# Altium PCB Diff_Pair.PcbDoc
Units mm, origin at the board's own origin, x right, y up, seen from the top; angles counter-clockwise.
Board outline 159.87 x 71.85 mm, 4 copper layers (Top Layer, GND 1, PWR, Bottom Layer), stack 1.625 mm thick; 14 components, 4 nets, 115 pads, 93 vias.
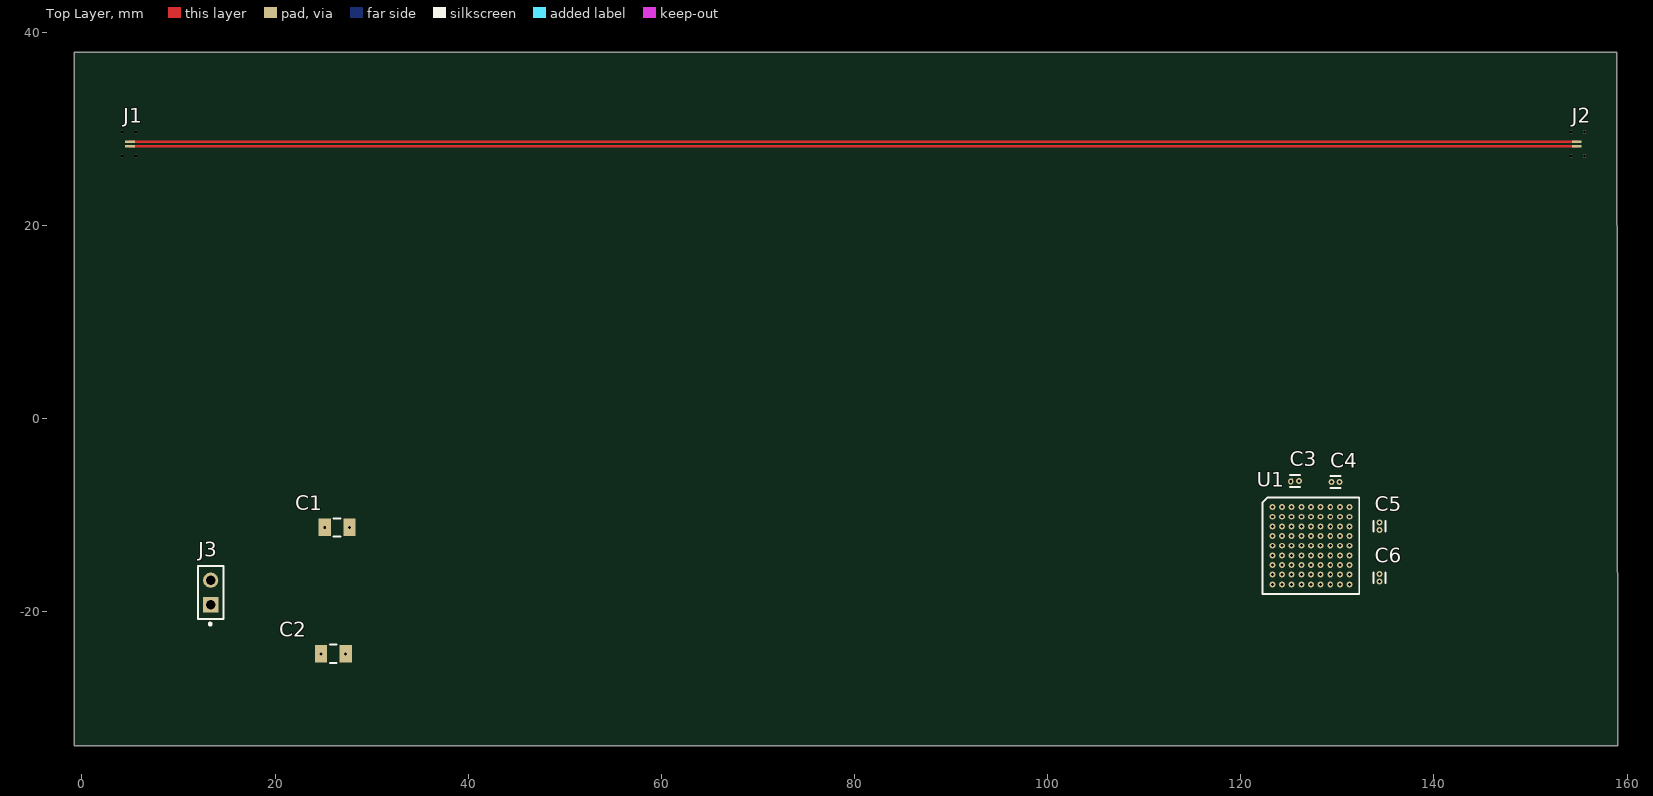
[diagram p0: Top Layer view]
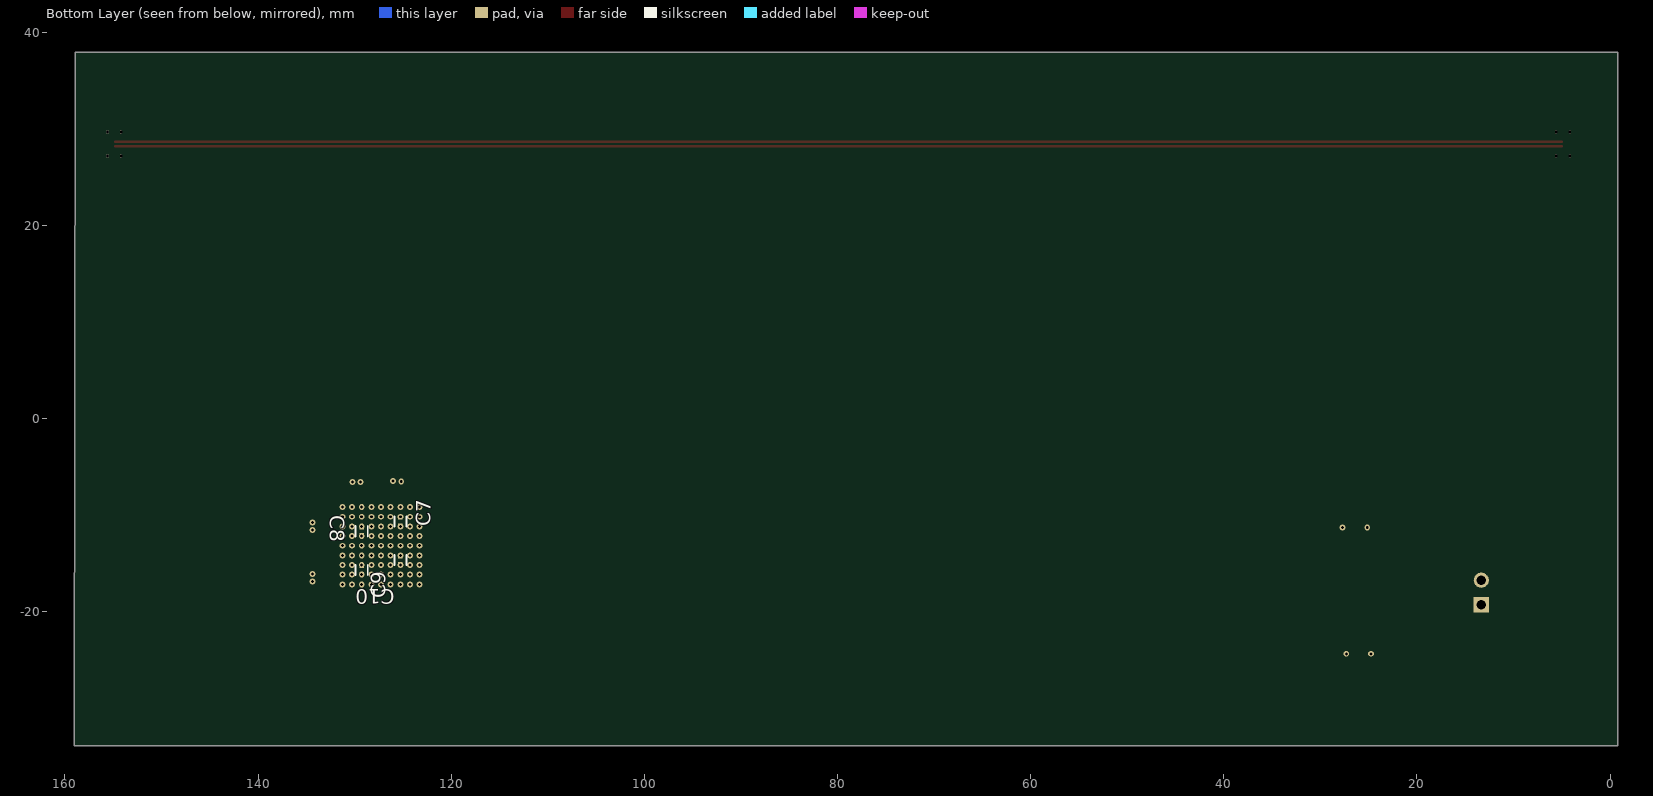
[diagram p1: Bottom Layer view, seen from below]
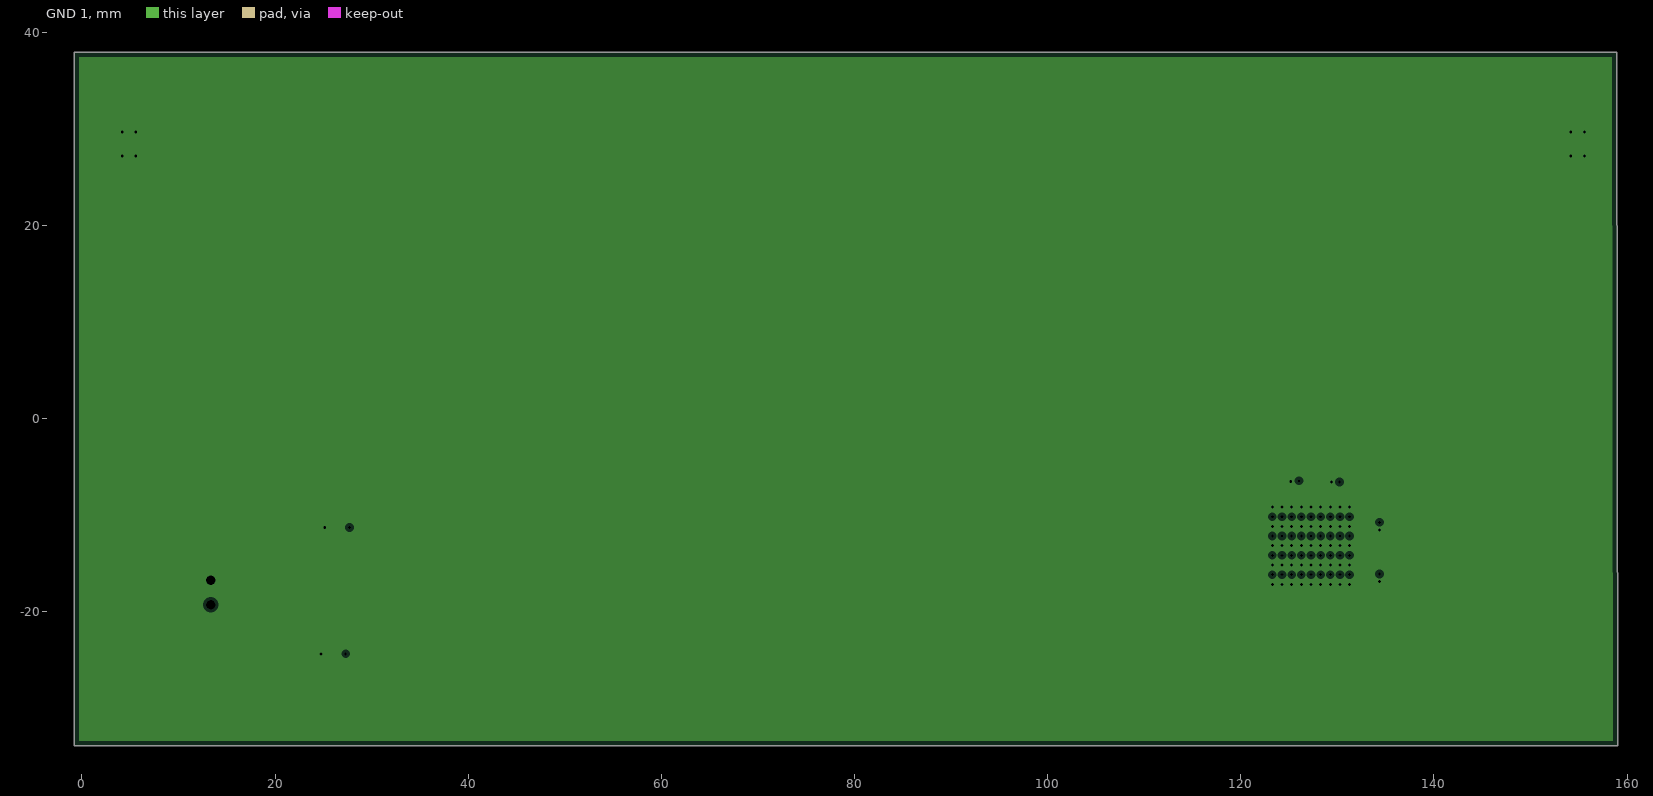
[diagram p2: GND 1, clearances drawn from the general rule]
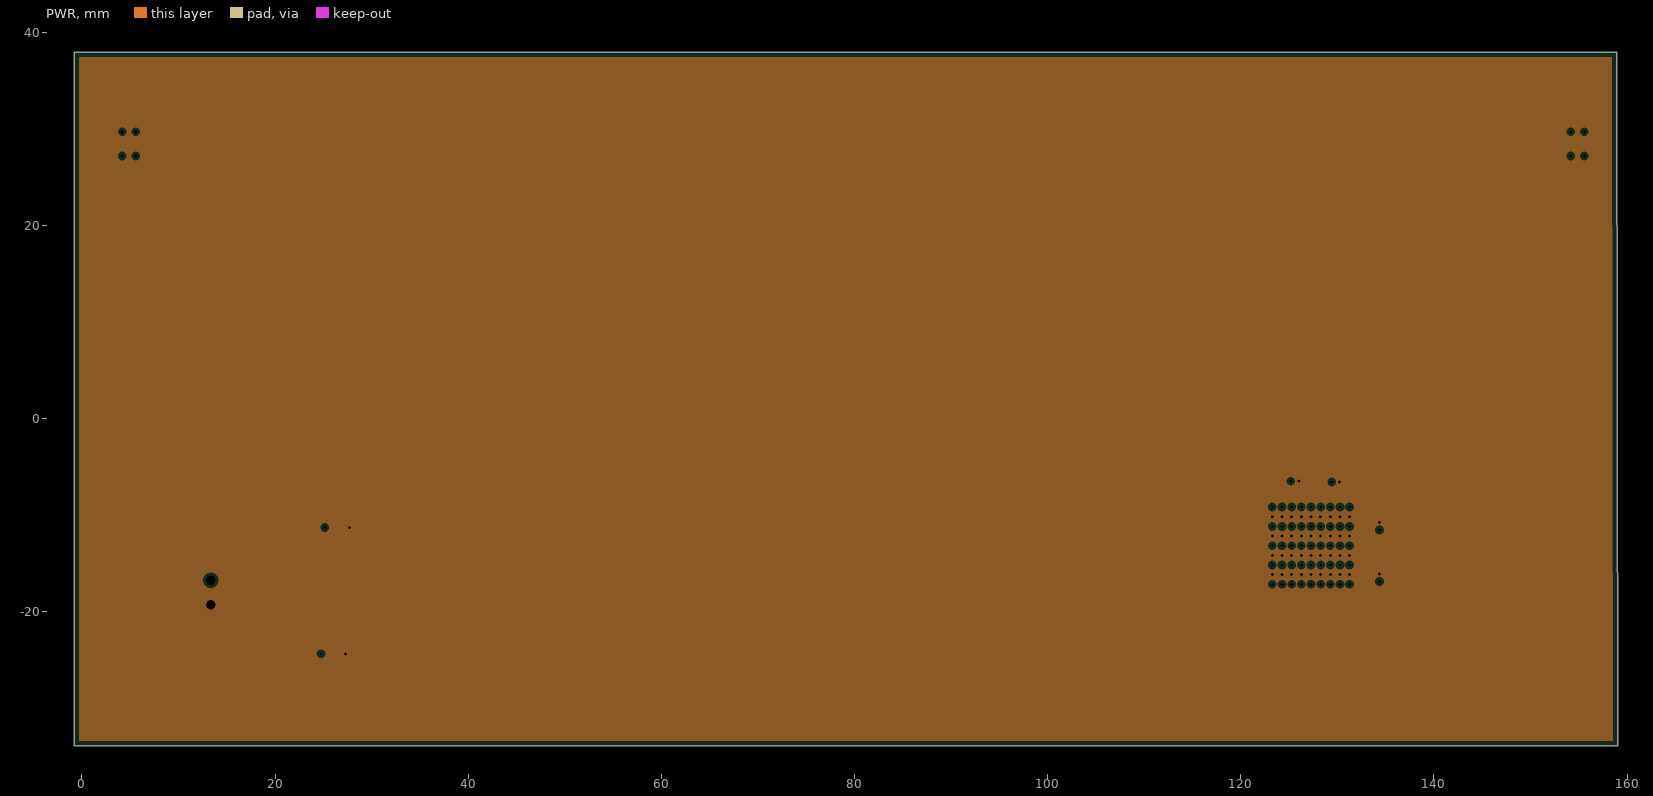
[diagram p3: PWR, clearances drawn from the general rule]
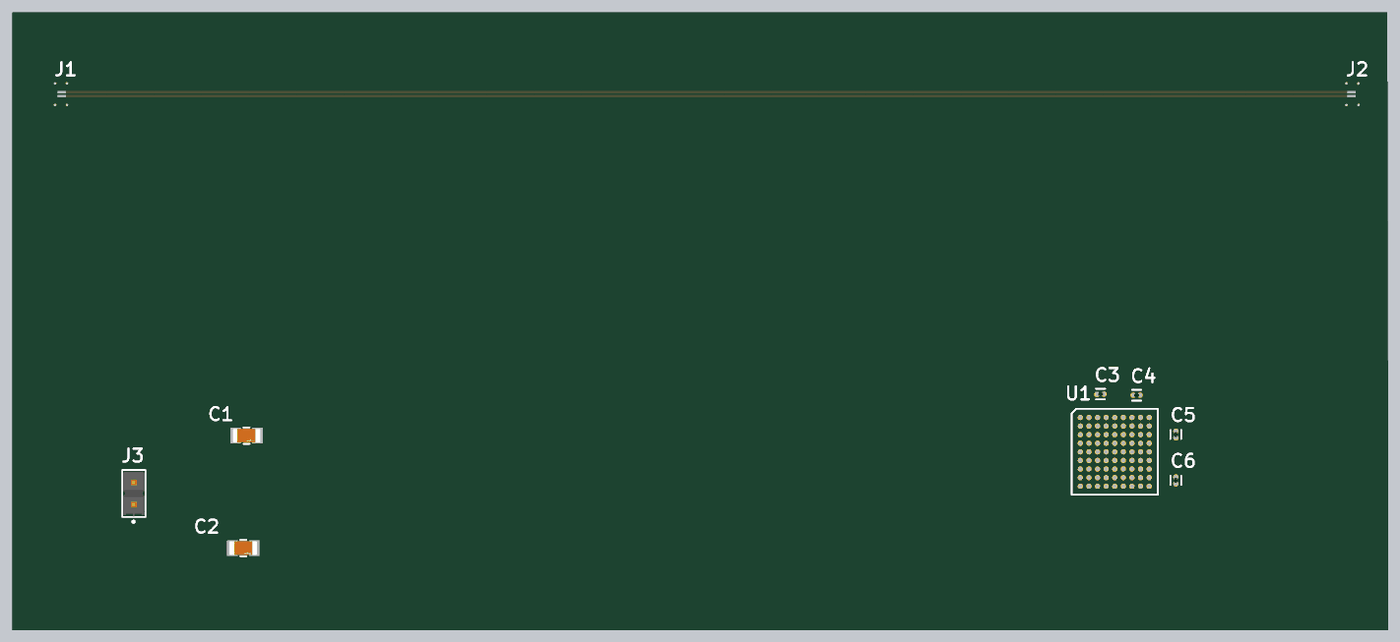
[diagram p4: 3D render of the assembled board from above, using the file's embedded part models]
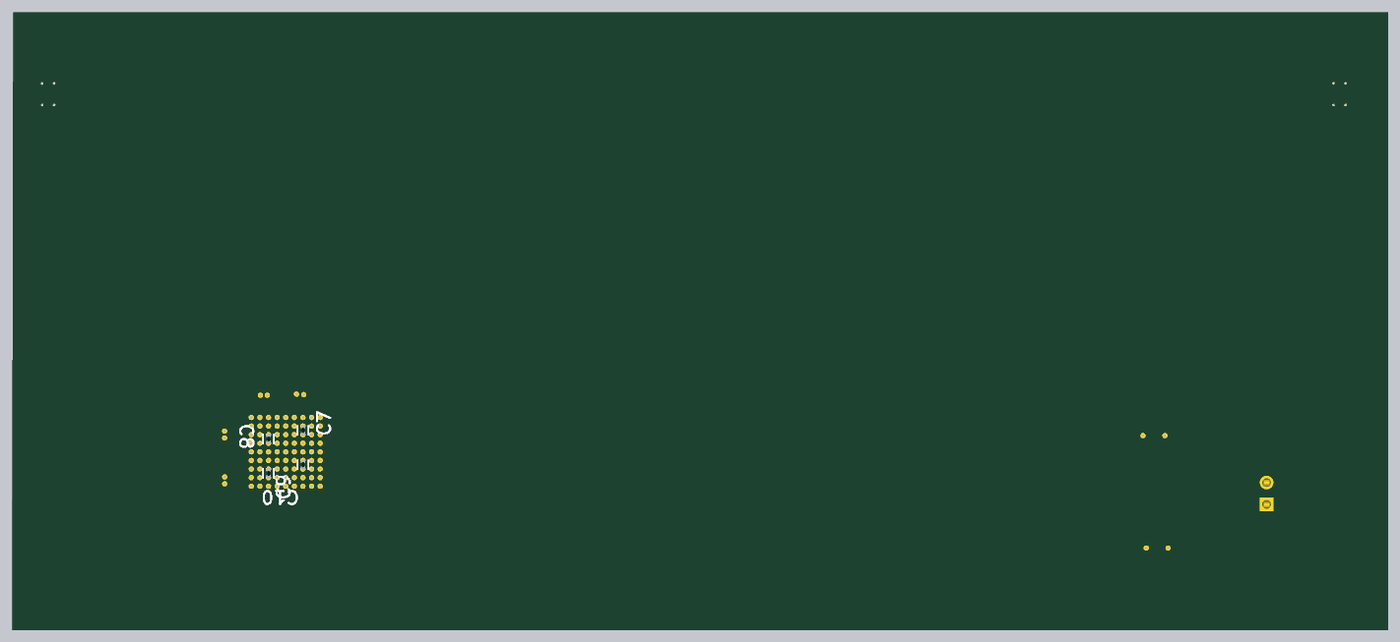
[diagram p5: 3D render of the assembled board from below, using the file's embedded part models]

## Layer stack, top to bottom
Top Solder: solder mask 0.0102, Solder Resist, Dk 3.5
Top Layer: signal copper 0.035
Dielectric 2: prepreg 0.21, PP-006, Dk 4.4
GND 1: plane copper 0.035, net GND
Dielectric 1: core 1.065, FR-4, Dk 4.6
PWR: plane copper 0.035, net VDD
Dielectric 3: prepreg 0.21, PP-006, Dk 4.4
Bottom Layer: signal copper 0.035
Bottom Solder: solder mask 0.0102, Solder Resist, Dk 3.5

## Board outline
-0.814,-33.925 -0.814,37.925 158.929,37.925 159.055,-33.925

## Design rules (kind name [scope] priority, off if disabled: settings)
Clearance [All] p1: gap=0.15 ignorepadtopadclearanceinfootprint=FALSE
DiffPairsRouting [InDifferentialPairClass('All Differential Pairs')] p1: maxlimit=0.22 minlimit=0.19 mostfreqgap=0.203 toplayer_minwidth=0.23 toplayer_maxwidth=0.26 toplayer_prefwidth=0.246 bottomlayer_maxgap=0.203 bottomlayer_minwidth=0.23 bottomlayer_maxwidth=0.26 bottomlayer_prefwidth=0.246 maxuncoupledlength=3
MinimumSolderMaskSliver [All] p1: minsoldermaskwidth=0.1
ParallelSegment [All] p1: limit=254 gap=0.254
PlaneClearance [All] p1: clearance=0.3
PlaneConnect [All] p1: planeconnectstyle=Direct reliefexpansion=0.508 reliefentries=4 reliefconductorwidth=0.254 reliefairgap=0.254
PolygonConnect [All] p1: connectstyle=Relief reliefconductorwidth=0.254 reliefentries=4 polygonreliefangle="90 Angle" airgapwidth=0.254
RoutingVias [InDifferentialPairClass('All Differential Pairs')] p1: holewidth=0.2 width=0.4 viastyle="Through Hole" minholewidth=0.2 minwidth=0.4 maxholewidth=0.2 maxwidth=0.4
SilkToSilkClearance [All] p1: silktosilkclearance=0.15
SilkToSolderMaskClearance [IsPad] p1: minsilkscreentomaskgap=0.15 clearancetoexposedcopper=TRUE
SolderMaskExpansion [All] p1: expansion=0 istentingtop=FALSE
SupplyNets "Schematic Supply Nets_1" [InNet('VDD')] p1: voltage=0.000
SupplyNets "Schematic Supply Nets" [InNet('GND')] p2: voltage=0.000
Width [All] p1: maxlimit=0.5 minlimit=0.15 preferedwidth=0.246
24 further rules are at their usual default settings.

## Classes and differential pairs
differential pair C: +C_P -C_N

## Components (designator, comment, footprint, x,y, rotation, side; value= is the part's Value field where it differs from the comment)
C1 "GRM31CD80G107MEA8K" FP-GRM31C-0_3-e0_3_0_8-IPC_C 26.421,-11.303 r0 top
C2 "GRM31CD80G107MEA8K" FP-GRM31C-0_3-e0_3_0_8-IPC_C 26.04,-24.384 r0 top
C3 "GRM155R71C104KA88D" FP-GRM15-MFG 125.622,-6.477 r0 top value=0.10μF
C4 "GRM155R71C104KA88D" FP-GRM15-MFG 129.813,-6.604 r0 top value=0.10μF
C5 "GRM155R71C104KA88D" FP-GRM15-MFG 134.366,-11.176 r90 top value=0.10μF
C6 "GRM155R71C104KA88D" FP-GRM15-MFG 134.366,-16.51 r90 top value=0.10μF
C7 "GRM155R71C104KA88D" FP-GRM15-MFG 125.27,-10.692 r90 bottom value=0.10μF
C8 "GRM155R71C104KA88D" FP-GRM15-MFG 129.27,-11.692 r270 bottom value=0.10μF
C9 "GRM155R71C104KA88D" FP-GRM15-MFG 125.27,-14.692 r90 bottom value=0.10μF
C10 "GRM155R71C104KA88D" FP-GRM15-MFG 129.27,-15.692 r270 bottom value=0.10μF
J1 "LAUNCH" LAUNCH_FP 4.873,28.413 r0 top
J2 "LAUNCH" LAUNCH_FP 154.873,28.413 r180 top
J3 "TSW-102-22-G-S" FP-TSW-102-22-G-S-MFG 13.335,-18.034 r90 top
U1 "LOADBGA_81" BGA81_LOAD 123.27,-9.192 r0 top

## Footprints (in the part's own frame and the unit in brackets; to place one, negate y for a bottom-side part, rotate by r counter-clockwise, add the part's x,y. Pads: shape width x height; smd on the part's side, far side on the other; paste and mask are expansions set on the pad)
BGA81_LOAD [mm]
  round 0.5 smd: 1(0,-7) 1(0,-5) 1(0,-3) 1(0,-1) 1(1,-7) 1(1,-5) 1(1,-3) 1(1,-1) 1(2,-7) 1(2,-5) 1(2,-3) 1(2,-1) 1(3,-7) 1(3,-5) 1(3,-3) 1(3,-1) 1(4,-7) 1(4,-5) 1(4,-3) 1(4,-1) 1(5,-7) 1(5,-5) 1(5,-3) 1(5,-1) 1(6,-7) 1(6,-5) 1(6,-3) 1(6,-1) 1(7,-7) 1(7,-5) 1(7,-3) 1(7,-1) 1(8,-7) 1(8,-5) 1(8,-3) 1(8,-1) 2(0,-8) 2(0,-6) 2(0,-4) 2(0,-2) 2(0,0) 2(1,-8) 2(1,-6) 2(1,-4) 2(1,-2) 2(1,0) 2(2,-8) 2(2,-6) 2(2,-4) 2(2,-2) 2(2,0) 2(3,-8) 2(3,-6) 2(3,-4) 2(3,-2) 2(3,0) 2(4,-8) 2(4,-6) 2(4,-4) 2(4,-2) 2(4,0) 2(5,-8) 2(5,-6) 2(5,-4) 2(5,-2) 2(5,0) 2(6,-8) 2(6,-6) 2(6,-4) 2(6,-2) 2(6,0) 2(7,-8) 2(7,-6) 2(7,-4) 2(7,-2) 2(7,0) 2(8,-8) 2(8,-6) 2(8,-4) 2(8,-2) 2(8,0)
  silkscreen extent -1,-9 9,1
FP-GRM15-MFG [mm]
  rect 0.4x0.5 smd paste+0 mask+0: 1(-0.4,0) 2(0.4,0)
  silkscreen extent -0.53,-0.62 0.53,0.62, body extent -0.7,-0.38 0.7,0.38, height 0.25
FP-GRM31C-0_3-e0_3_0_8-IPC_C [mm]
  rect 1.253x1.804 smd paste+0 mask+0: 1(-1.275,0) 2(1.275,0)
  silkscreen extent -0.35,-0.95 0.35,0.95, body extent -2,-1.05 2,1.05, height 0.25
FP-TSW-102-22-G-S-MFG [mm]
  rect 1.57x1.57 hole 1.02 paste-2539.97 mask+0: 1(-1.27,0)
  round 1.57 hole 1.02 paste-2539.97 mask+0: 2(1.27,0)
  silkscreen extent -3.4,-1.34 2.73,1.34, body extent -2.83,-1.44 2.83,1.44, height 0.25
LAUNCH_FP [mm]
  rect 1x0.246 smd: 1(0.1,0.224) 2(0.1,-0.224)
  rect 0.2x0.3 hole 0.3: 3(-0.7,-1.25) 3(-0.7,1.25) 3(0.7,-1.25) 3(0.7,1.25)

## Part data
C1 C2: library part CMP-06035-051614-1, "Chip Multilayer Ceramic Capacitors for General Purpose, 1206, 100uF, X6T, +22%/-33%, 20%, 4V"
C3 C4 C5 C6 C7 C8 C9 C10: library part CMP-2100-03641-2, "CAP CER 0.1UF 16V X7R 0402", Capacitance=0.10μF, Manufacturer=Murata, Package=GRM15, Temperature="-55°C to +125°C", Temperature Characteristic=X7R, Temperature Range High=+125°C, Temperature Range Low=-55°C, Tolerance=10%, Voltage Rating=16Vdc, Category=Cap, ComponentLink2Description=Datasheet, ComponentLink2URL=https://search.murata.co.jp/Ceramy/image/img/A01X/G101/ENG/GRM155R71H471KA01-01A.pdf, Device Class L1="Passive Components", Device Class L2=Capacitors, Device Class L3="Ceramic Capacitors", Digikey Description="CAP CER 0.1UF 16V X7R 0402", Height=0.55mm, Ipc Land Pattern Name=CAPC10050X219, Lead Free=yes, Manufacturer Part Number=GRM155R71C104KA88D, Material=Ceramic, Mouser Description="0402 0.1 uF 16V ±10 % Tolerance X7R SMT Multilayer Ceramic Capacitor", Octopart=https://octopart.com/grm155r71c104ka88d-murata-196880, RoHS=TRUE, Standoff Height=0mm
J3: library part CMP-02766-000117-1, "CONN HEADER VERT 2POS 2.54MM", Housing Color=Black, Max Current Rating=7.6A, Max Operating Temperature=125°C, Max Voltage Rating (AC)=550V, Min Operating Temperature=-55°C, Contact Material=Bronze, Contact Plating=Gold, Depth=2.54mm, Gender=Male, Housing Material=Polyester, Length=5.08mm, Number of Contacts=2, Number of Rows=1, Orientation=Straight, Packaging=Bulk, Pitch=2.54mm, Radiation Hardening=No, REACH SVHC="No SVHC", Termination=Solder
U1: library part LOAD_BGA81

## Via types
v1: diameter 0.61, hole 0.305, Top Layer to Bottom Layer, 93 vias

## Nets (pads, with @x,y where several pads share a name; then routed paths per layer and width w, separated by ;. In a path a pad name is that pad's centre, name@x,y a point inside that pad or via, vN(x,y) a via of type N, cw(c..) or ccw(c..) an arc to the next point about the centre after c; other vN are vias at no path point)
C_N: J1.2 J2.1 | length 149.8
  Top Layer w0.246: J1.2 J2.1
C_P: J1.1 J2.2 | length 149.8
  Top Layer w0.246: J1.1 J2.2
GND: C1.1 C2.1 C3.1 C4.1 C5.1 C6.1 C7.1 C8.1 C9.1 C10.1 J1.3 J2.3 J3.2 U1.2
  other v1: 24.765,-24.384 123.27,-17.192 124.27,-17.192 125.27,-17.192 126.27,-17.192 127.27,-17.192 128.27,-17.192 129.27,-17.192 130.27,-17.192 131.27,-17.192 134.366,-16.91 123.27,-15.192 124.27,-15.192 125.27,-15.192 126.27,-15.192 127.27,-15.192 128.27,-15.192 129.27,-15.192 130.27,-15.192 131.27,-15.192 123.27,-13.192 124.27,-13.192 125.27,-13.192 126.27,-13.192 127.27,-13.192 128.27,-13.192 129.27,-13.192 130.27,-13.192 131.27,-13.192 134.366,-11.576 25.146,-11.303 123.27,-11.192 124.27,-11.192 125.27,-11.192 126.27,-11.192 127.27,-11.192 128.27,-11.192 129.27,-11.192 130.27,-11.192 131.27,-11.192 123.27,-9.192 124.27,-9.192 125.27,-9.192 126.27,-9.192 127.27,-9.192 128.27,-9.192 129.27,-9.192 130.27,-9.192 131.27,-9.192 129.413,-6.604 125.175,-6.528
VDD: C1.2 C2.2 C3.2 C4.2 C5.2 C6.2 C7.2 C8.2 C9.2 C10.2 J3.1 U1.1
  other v1: 27.316,-24.384 123.27,-16.192 124.27,-16.192 125.27,-16.192 126.27,-16.192 127.27,-16.192 128.27,-16.192 129.27,-16.192 130.27,-16.192 131.27,-16.192 134.366,-16.11 123.27,-14.192 124.27,-14.192 125.27,-14.192 126.27,-14.192 127.27,-14.192 128.27,-14.192 129.27,-14.192 130.27,-14.192 131.27,-14.192 123.27,-12.192 124.27,-12.192 125.27,-12.192 126.27,-12.192 127.27,-12.192 128.27,-12.192 129.27,-12.192 130.27,-12.192 131.27,-12.192 27.697,-11.303 134.366,-10.776 123.27,-10.192 124.27,-10.192 125.27,-10.192 126.27,-10.192 127.27,-10.192 128.27,-10.192 129.27,-10.192 130.27,-10.192 131.27,-10.192 130.213,-6.604 126.022,-6.477

## Polygon pours and split planes (outlines as drawn)
GND on GND 1 (split plane): 158.544,-33.414 -0.303,-33.414 -0.303,37.414 158.419,37.414
VDD on PWR (split plane): 158.544,-33.414 -0.303,-33.414 -0.303,37.414 158.419,37.414

## Silkscreen, mask and mechanical layers (free items; w line width, h text height)
Mechanical 1:
  lines w0.15: 159.004,38 159.131,-34 -0.889,-34 -0.889,38 159.131,38